# Altium PCB FanoutTest.PcbDoc
Units mil, origin at the board's own origin, x right, y up, seen from the top; angles counter-clockwise.
Board outline 1721.43 x 2434.85 mil, 4 copper layers (Top Layer, GND, POWER, Bottom Layer), stack 61.066 mil thick; 33 components, 24 nets, 129 pads, 750 vias.
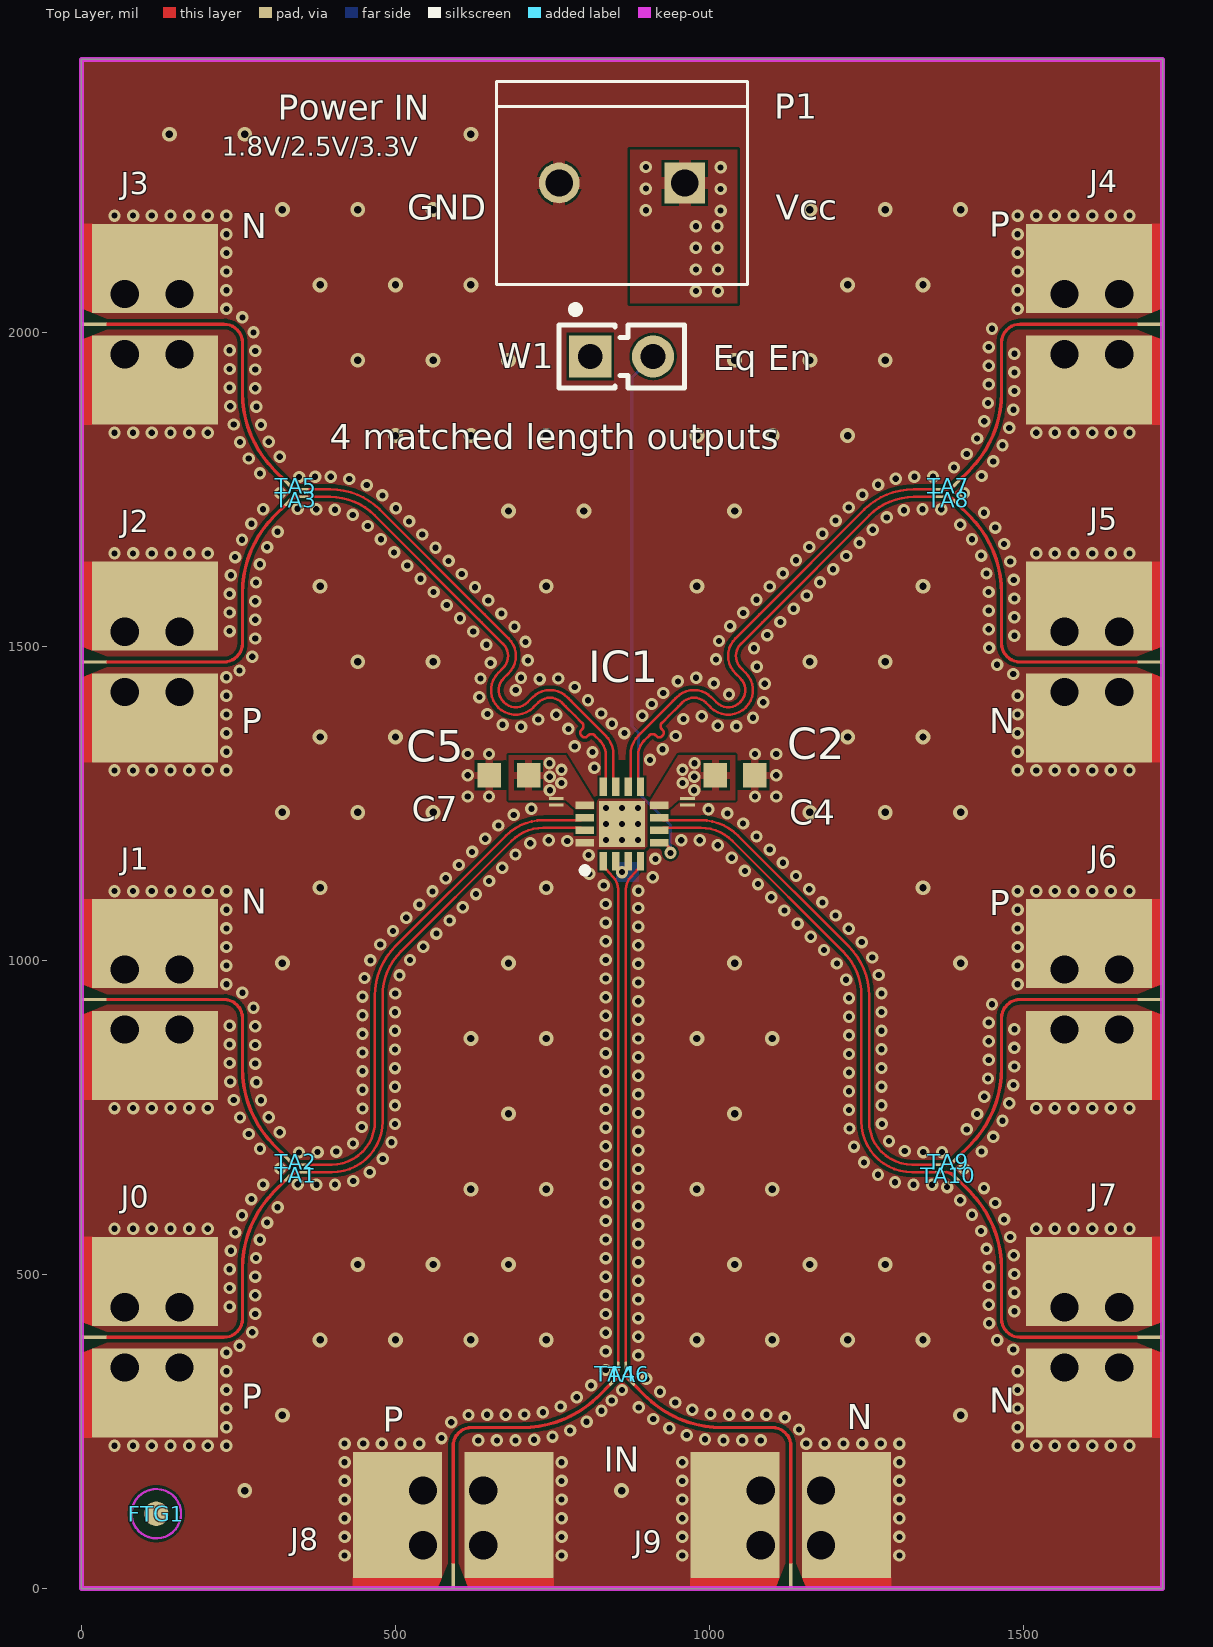
[diagram p0: Top Layer view]
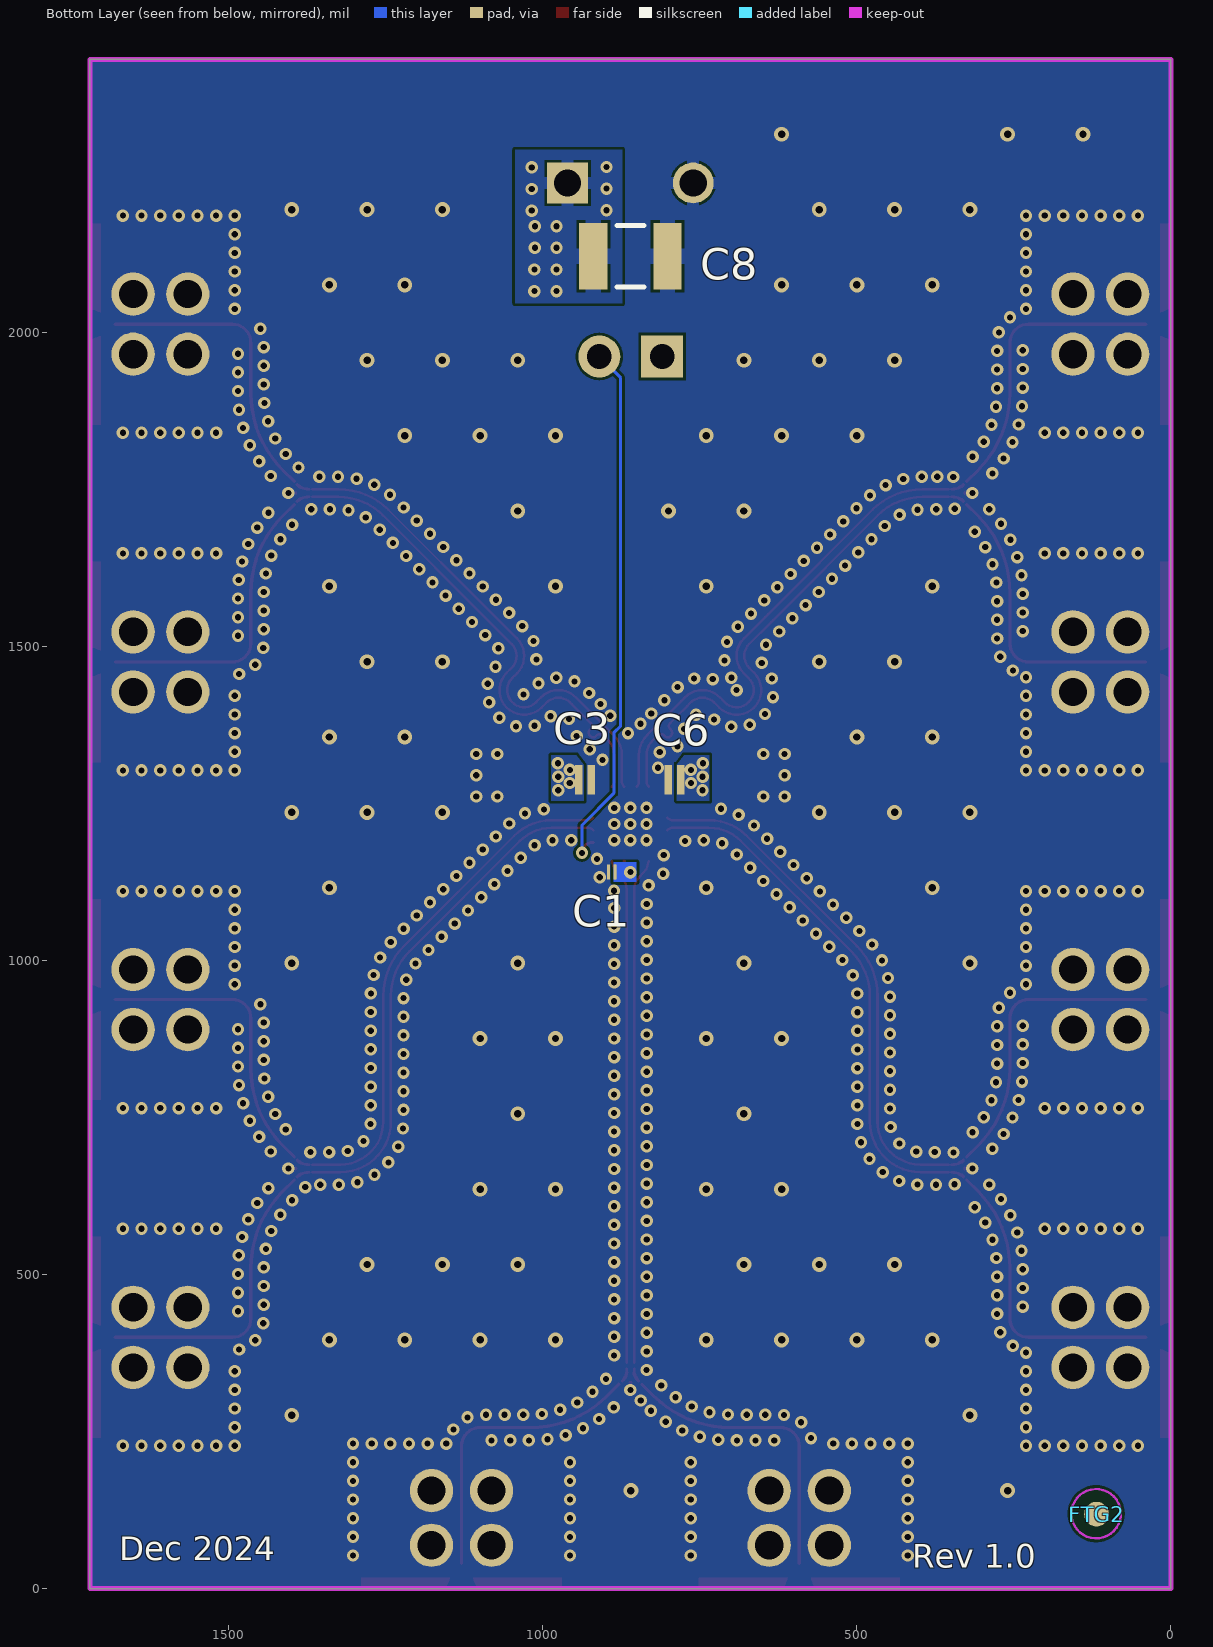
[diagram p1: Bottom Layer view, seen from below]
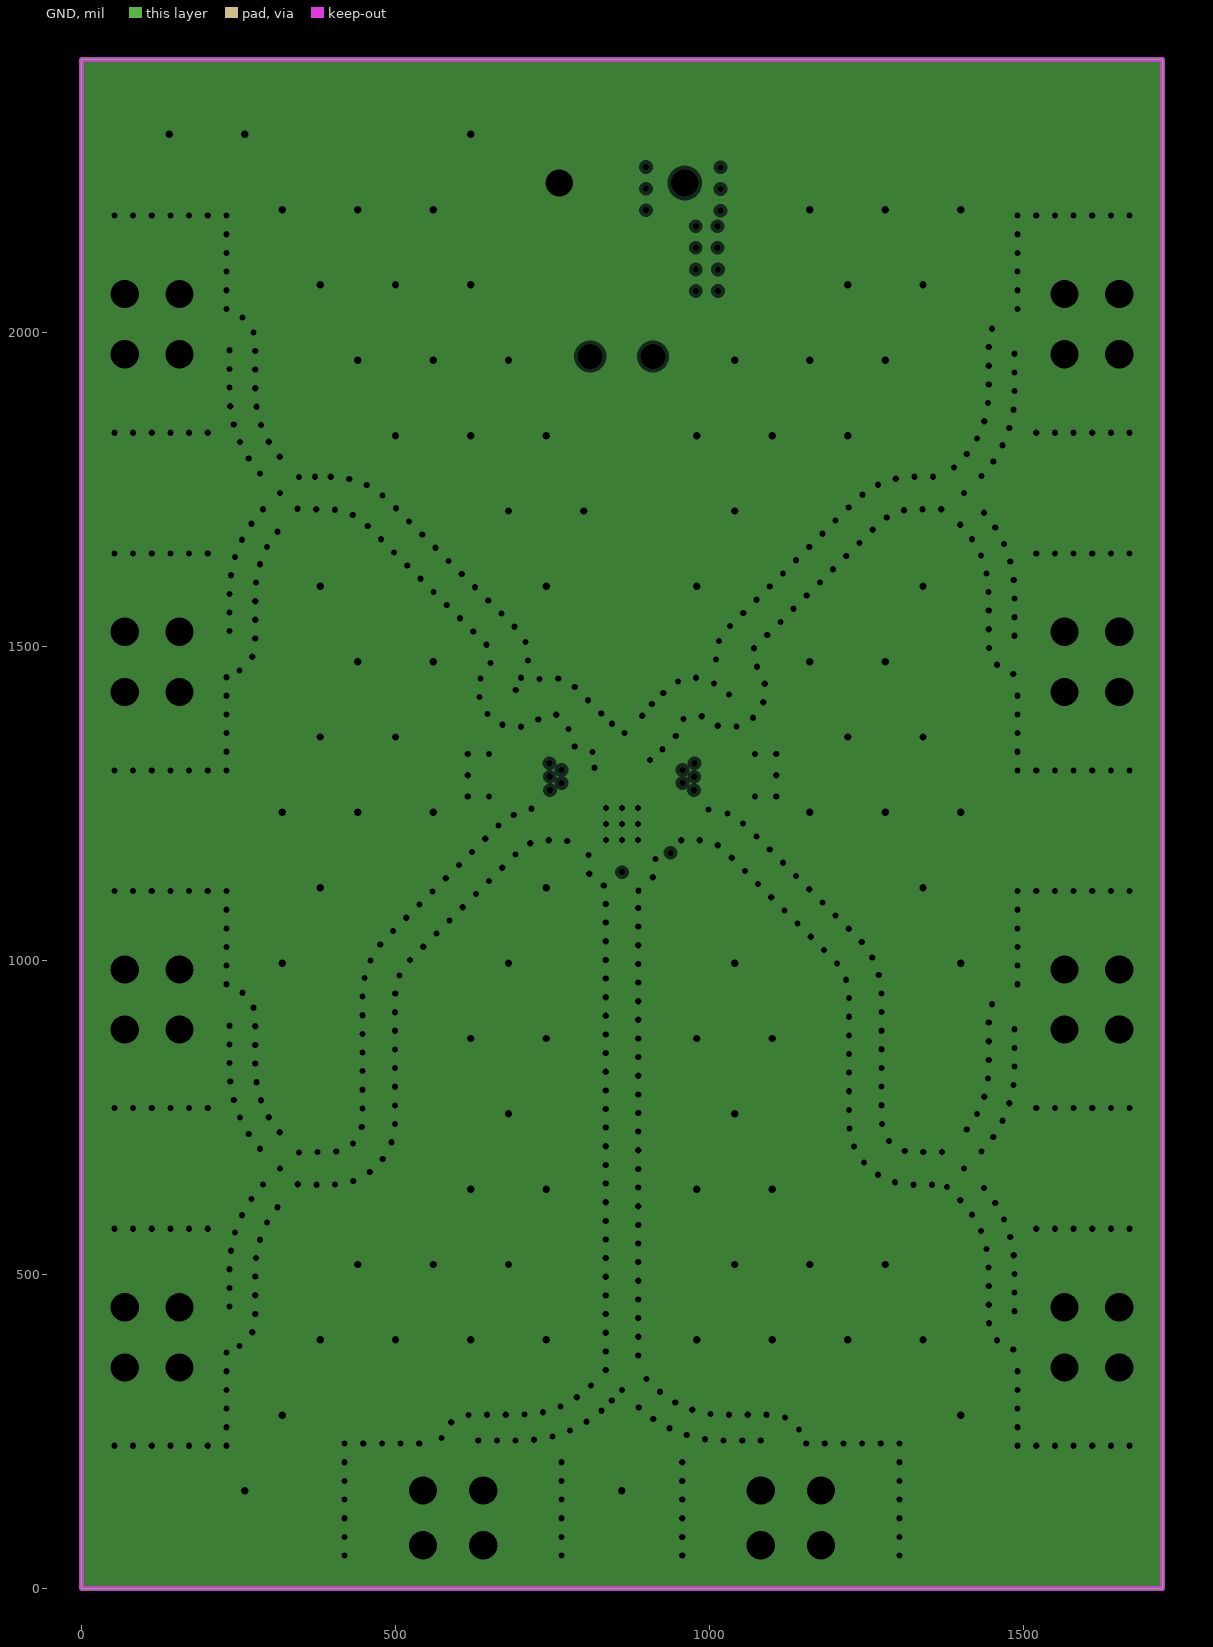
[diagram p2: GND, clearances drawn from the general rule]
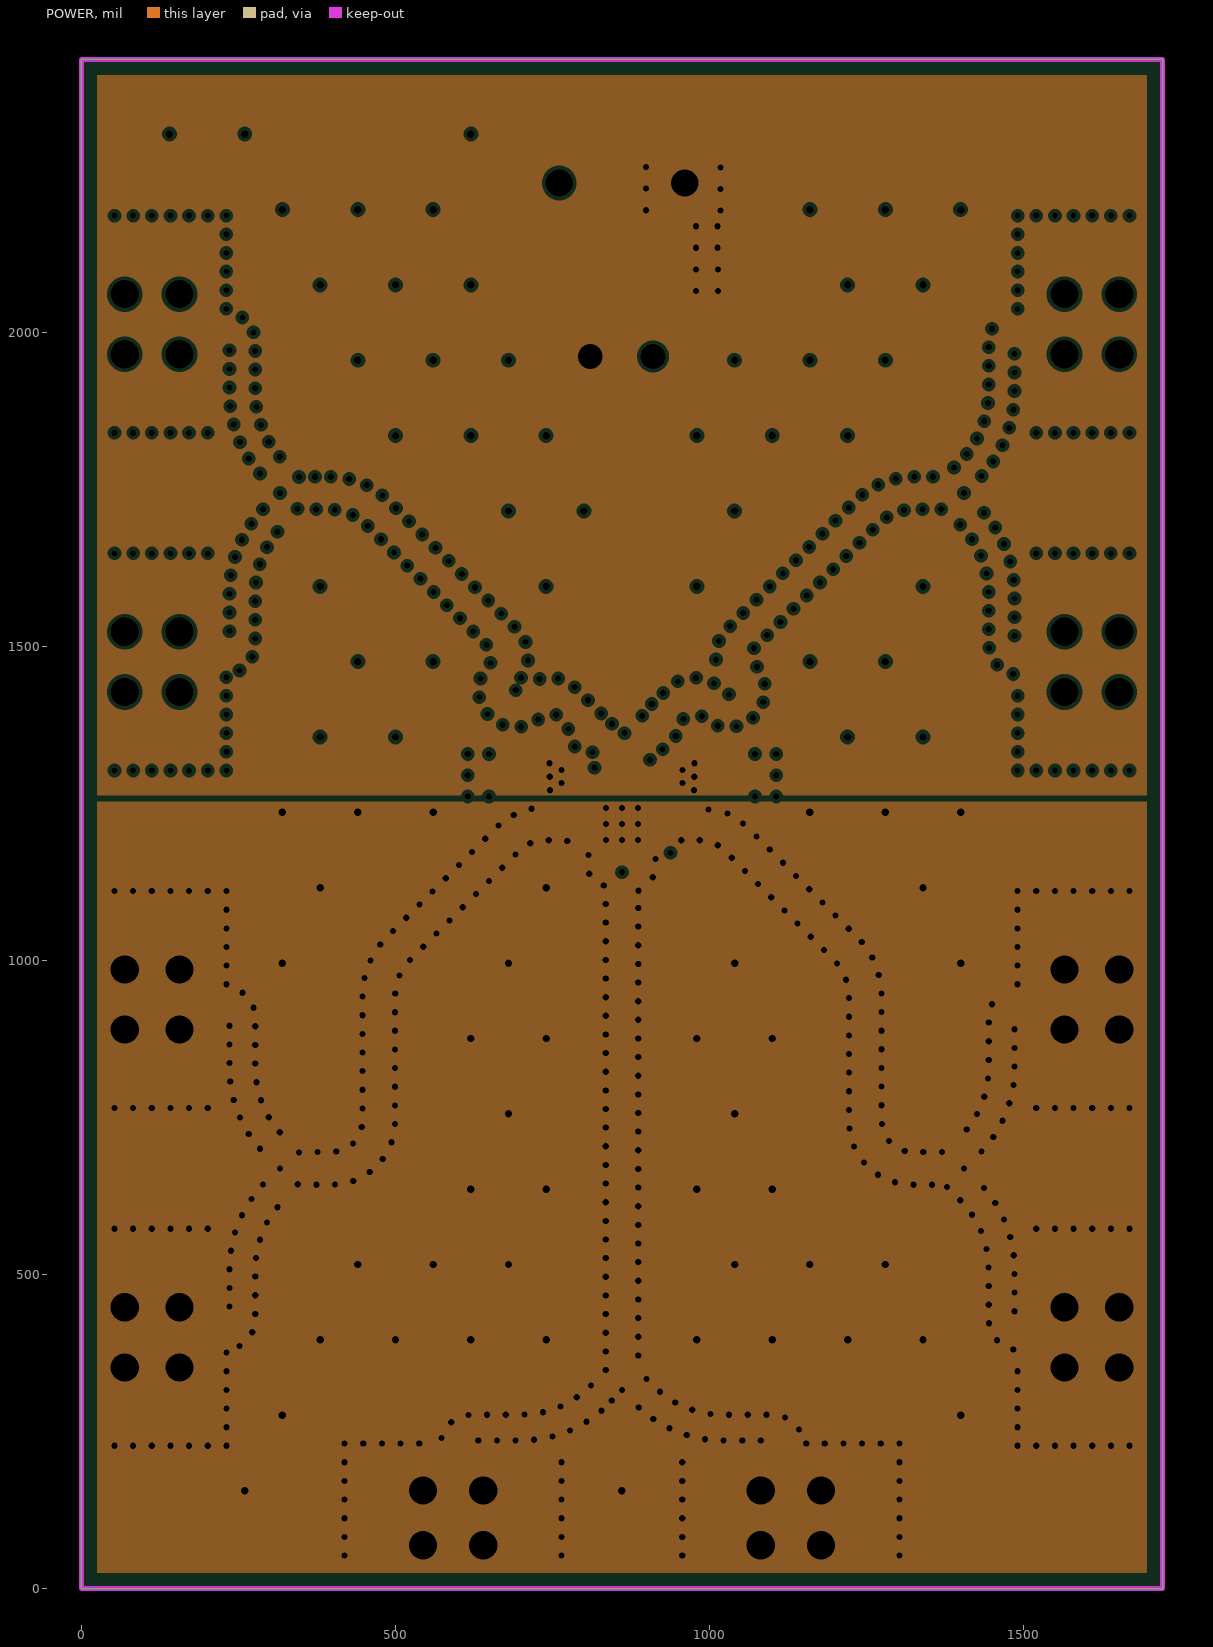
[diagram p3: POWER, clearances drawn from the general rule]
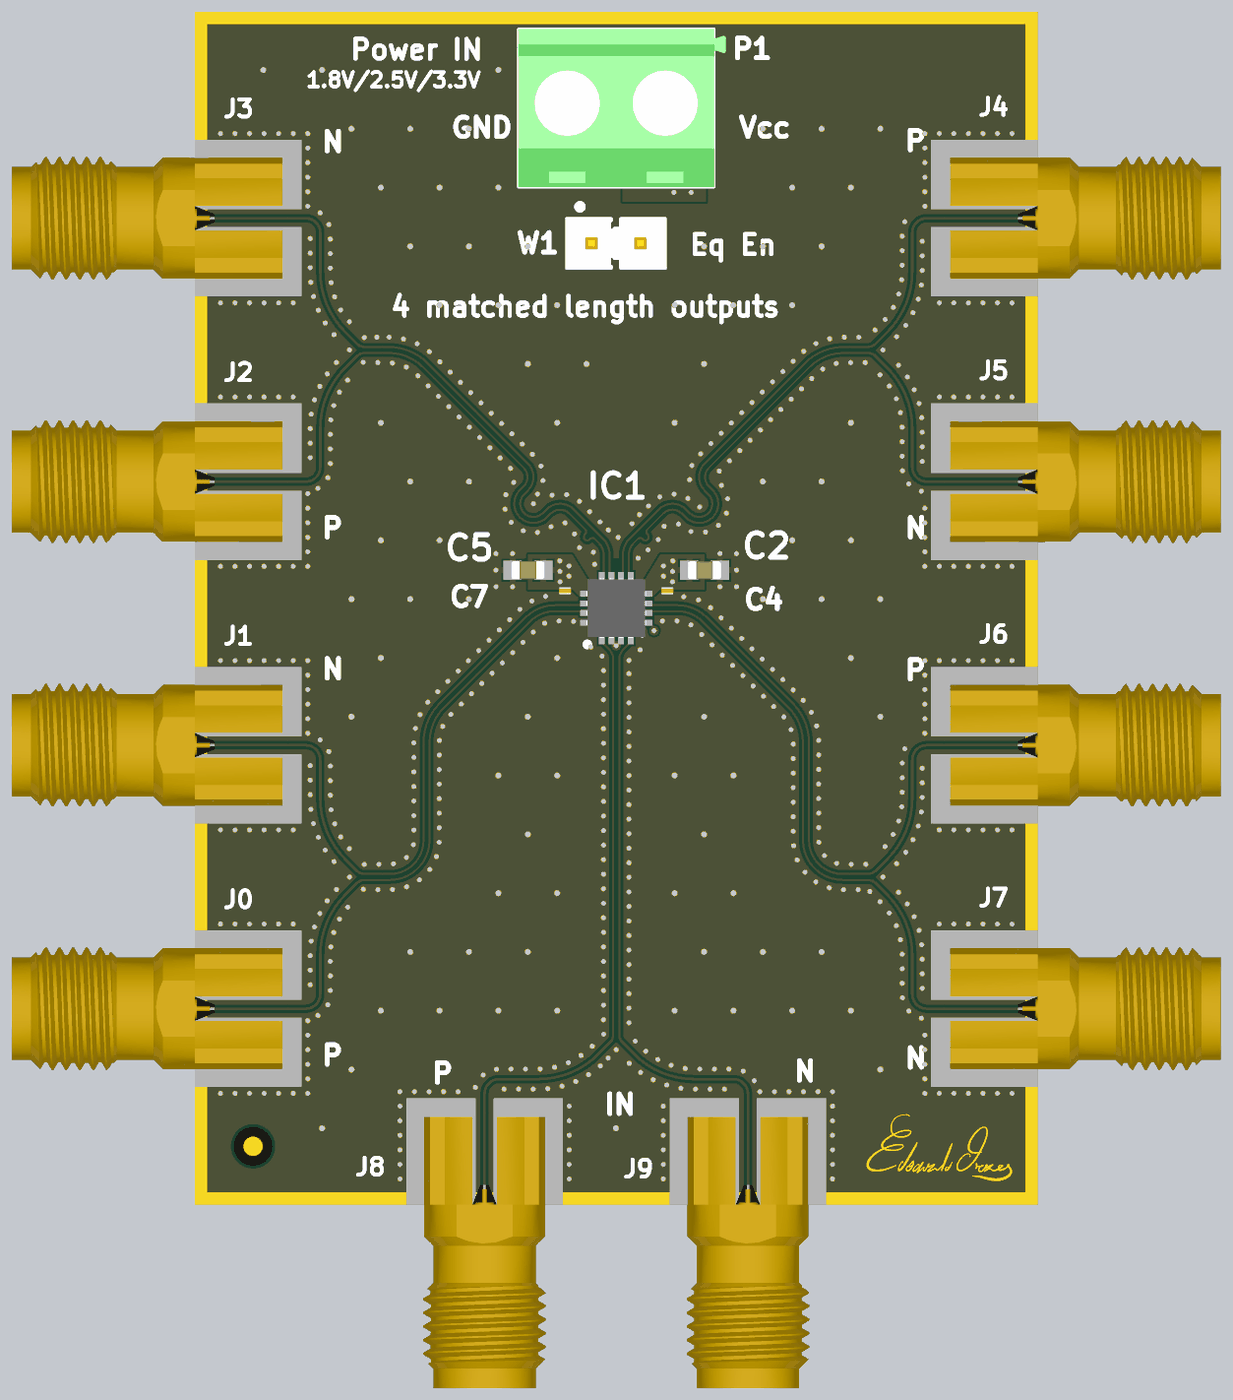
[diagram p4: 3D render of the assembled board from above, using the file's embedded part models]
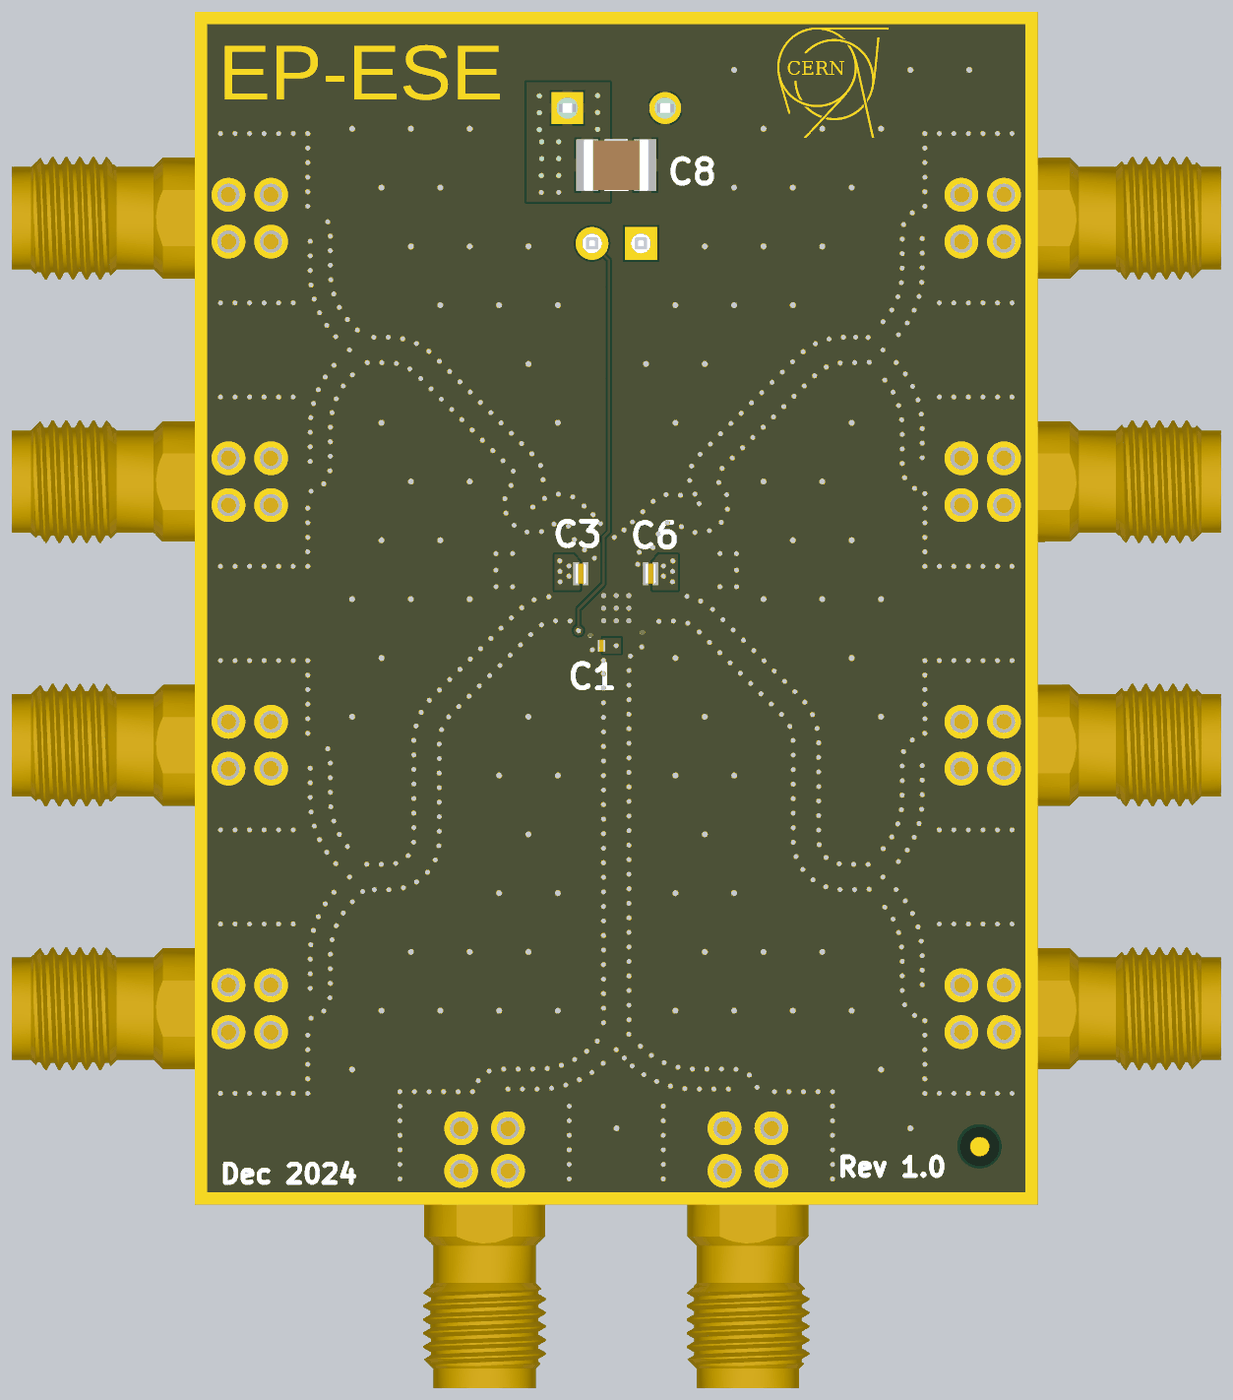
[diagram p5: 3D render of the assembled board from below, using the file's embedded part models]

## Layer stack, top to bottom
Top Solder: solder mask 1.969, Solder Resist, Dk 4.6
Top Layer: signal copper 1.772
Core_Top: core 3.937, R-5775G_1035, Dk 3.46
GND: plane copper 0.689, net GND
PrePreg_Top: prepreg 9.371, R-5670G, Dk 3.4
Core: core 29.528, R-5775G_2116, Dk 3.71
PrePreg_Bot: prepreg 9.371, R-5670G, Dk 3.4
POWER: plane copper 0.689, net Vcc
Core_Bottom: core 3.937, R-5775G_1035, Dk 3.46
Bottom Layer: signal copper 1.772
Bottom Solder: solder mask 1.969, Solder Resist, Dk 4.6

## Board outline
0,0 0,2434.85 1721.43,2434.85 1721.43,0

## Design rules (kind name [scope] priority, off if disabled: settings)
BoardOutlineClearance BoardOutlineClearance_Silk_SMA [HasFootprint('CONSMA022-G') And (OnLayer('Top Overlay') Or OnLayer('Bottom Overlay'))] p1: gap=0 ignorepadtopadclearanceinfootprint=FALSE
BoardOutlineClearance [All] p2: gap=20 ignorepadtopadclearanceinfootprint=FALSE except(0: SMDPad-OutlineEdge Fill-OutlineEdge Poly-OutlineEdge Region-OutlineEdge)
Clearance Clearance_Coplanar [InAnyDifferentialPair or InNetClass('50ohm') or HasFootprint('lane_width_transition')] p1: gap=4 ignorepadtopadclearanceinfootprint=FALSE except(6: Arc-Fill Arc-Poly Arc-Region Track-Fill Track-Poly Track-Region Fill-Fill Fill-Poly Fill-Region Poly-Poly Poly-Region Region-Region)
Clearance Clearance_SMA_pad [HasFootprint('CONSMA022-G') and InNetClass('50ohm')] p2: gap=4 ignorepadtopadclearanceinfootprint=FALSE except(27.6: SMDPad-Fill SMDPad-Poly SMDPad-Region)
Clearance Clearance_SMA_pad_pad [HasFootprint('CONSMA022-G')] p3: gap=4 ignorepadtopadclearanceinfootprint=TRUE
Clearance Clearance_1 [All] p4: gap=4 ignorepadtopadclearanceinfootprint=FALSE
ComponentClearance [All] p1: gap=0 collisioncheckmode=3 verticalgap=0 showdistances=FALSE
DiffPairsRouting [InDifferentialPairClass('All Differential Pairs')] p1: maxlimit=8.23 minlimit=8.23 mostfreqgap=8.23 toplayer_minwidth=4 toplayer_maxwidth=4 toplayer_prefwidth=4 bottomlayer_minwidth=4 bottomlayer_maxwidth=4 bottomlayer_prefwidth=4 impedanceprofiledriven=TRUE impedanceprofileid={AE721103-BE0F-4CC0-B565-BE557CF18860} impedanceprofilevalue=100.000000 maxuncoupledlength=200
HoleSize [All] p1: absolutevalues=TRUE maxlimit=255.91 minlimit=9.84 maxpercent=80.000 minpercent=20.000
HoleToHoleClearance [Isvia] p1: gap=11 allowstackedmicrovias=TRUE
HoleToHoleClearance HoleToHoleClearance_Standard [All] p2: gap=16 allowstackedmicrovias=TRUE
MatchedLengths MatchedLengths_Output_Lanes [InNetClass('Output_Lanes')] p1: tolerance=1.5 checknetsindiffpair=FALSE checkdiffpairvsdiffpair=TRUE checkxsignals=TRUE checkothers=TRUE
MatchedLengths MatchedLengths_Inside [InDifferentialPairClass('All Differential Pairs')] p2: tolerance=1 checknetsindiffpair=TRUE checkdiffpairvsdiffpair=FALSE checkxsignals=FALSE checkothers=FALSE
MinimumAnnularRing [not IsVia] p1: minimumring=6
MinimumSolderMaskSliver [All] p1: minsoldermaskwidth=2
PlaneClearance [All] p1: clearance=6
PlaneConnect PlaneConnect_SMA [HasFootprint('CONSMA022-G')] p1: planeconnectstyle=Direct reliefexpansion=20 reliefentries=4 reliefconductorwidth=10 reliefairgap=10
PlaneConnect PlaneConnect_Frame_Hole [InPadClass('Frame_Holes')] p2: planeconnectstyle=Direct reliefexpansion=20 reliefentries=4 reliefconductorwidth=10 reliefairgap=10
PlaneConnect PlaneConnect_PWR [InComponentClass('PWR_Jumper') or HasFootprint('TE_282837-2')] p3: planeconnectstyle=Relief reliefexpansion=20 reliefentries=4 reliefconductorwidth=25 reliefairgap=7
PlaneConnect [All] p4: pad.planeconnectstyle=Relief pad.reliefexpansion=20 pad.reliefentries=4 pad.reliefconductorwidth=12 pad.reliefairgap=7 via.planeconnectstyle=Direct via.reliefexpansion=20 via.reliefentries=4 via.reliefconductorwidth=10 via.reliefairgap=10
PolygonConnect PolygonConnect_SMA [HasFootprint('CONSMA022-G')] p1: connectstyle=Direct reliefconductorwidth=10 reliefentries=4 polygonreliefangle="90 Angle" airgapwidth=4
PolygonConnect PolygonConnect_Direct [(HasFootprint('CP_32_11_ADI') OR HasFootprint('LLL03TR61E333KE01') OR HasFootprint('SON50P300X300X80-11N-R175X248') OR HasFootprint('CAPC0510X04N') OR HasFootprint('QFN50P300X300X100-17N'))] p2: connectstyle=Direct reliefconductorwidth=10 reliefentries=4 polygonreliefangle="90 Angle" airgapwidth=10 // LDO, CDR, FF, Fanout, some small capacitor
PolygonConnect PolygonConnect_Large [AsMM(PadXSize_AllLayers + PadYSize_AllLayers) > 2.5] p3: thpad.connectstyle=Relief thpad.reliefconductorwidth=20 thpad.reliefentries=4 thpad.polygonreliefangle="90 Angle" thpad.airgapwidth=4 smdpad.connectstyle=Relief smdpad.reliefconductorwidth=25 smdpad.reliefentries=4 smdpad.polygonreliefangle="90 Angle" smdpad.airgapwidth=4 via.connectstyle=Direct via.reliefconductorwidth=10 via.reliefentries=4 via.polygonreliefangle="90 Angle" via.airgapwidth=10
PolygonConnect "PolygonConnect_ Mid" [AsMM(PadXSize_AllLayers + PadYSize_AllLayers) > 1.5] p4: thpad.connectstyle=Relief thpad.reliefconductorwidth=12 thpad.reliefentries=4 thpad.polygonreliefangle="90 Angle" thpad.airgapwidth=4 smdpad.connectstyle=Relief smdpad.reliefconductorwidth=12 smdpad.reliefentries=4 smdpad.polygonreliefangle="90 Angle" smdpad.airgapwidth=4 via.connectstyle=Direct via.reliefconductorwidth=12 via.reliefentries=4 via.polygonreliefangle="90 Angle" via.airgapwidth=5
PolygonConnect [All] p5: thpad.connectstyle=Relief thpad.reliefconductorwidth=10 thpad.reliefentries=4 thpad.polygonreliefangle="90 Angle" thpad.airgapwidth=4 smdpad.connectstyle=Relief smdpad.reliefconductorwidth=8 smdpad.reliefentries=4 smdpad.polygonreliefangle="90 Angle" smdpad.airgapwidth=4 via.connectstyle=Direct via.reliefconductorwidth=10 via.reliefentries=4 via.polygonreliefangle="90 Angle" via.airgapwidth=10
RoutingVias [All] p1: holewidth=9.84 width=19.68 viastyle="Through Hole" minholewidth=9.84 minwidth=19.68 maxholewidth=11.81 maxwidth=23.62
SilkToSilkClearance [All] p1: silktosilkclearance=0
SilkToSolderMaskClearance [All] p1: minsilkscreentomaskgap=3.5 clearancetoexposedcopper=TRUE
SolderMaskExpansion SolderMaskExpansion_Via [IsVia] p1: expansion=4 istentingtop=TRUE
SolderMaskExpansion [All] p2: expansion=0 istentingtop=FALSE
Width Width_lane_width_transition_arcs [HasFootprint('lane_width_transition') and (IsArc or IsTrack)] p1: maxlimit=10 minlimit=1 preferedwidth=10 minimp=50.000000 maximp=50.000000 favimp=50.000000
Width Width_50ohm [InNetClass('50ohm')] p2: maxlimit=5.18 minlimit=5.18 preferedwidth=5.18 impedanceprofiledriven=TRUE impedanceprofileid={DDC6E9F5-BC60-4B40-A729-D674AE4FAE2B} impedanceprofilevalue=50.000000 minimp=50.000000 maximp=50.000000 favimp=50.000000
Width [All] p3: maxlimit=100 minlimit=5 preferedwidth=6 minimp=50.000000 maximp=50.000000 favimp=50.000000
21 further rules are at their usual default settings.

## Classes and differential pairs
net class Output_Lanes: OUT_0_N OUT_0_P OUT_1_N OUT_1_P OUT_2_N OUT_2_P OUT_3_N OUT_3_P
net class 50ohm: NetJ0_1 NetJ1_1 NetJ2_1 NetJ3_1 NetJ4_1 NetJ5_1 NetJ6_1 NetJ7_1 NetJ8_1 NetJ9_1
differential pair OUT_3: +OUT_3_P -OUT_3_N
differential pair OUT_2: +OUT_2_P -OUT_2_N
differential pair OUT_1: +OUT_1_P -OUT_1_N
differential pair OUT_0: +OUT_0_P -OUT_0_N
differential pair IN: +IN_P -IN_N

## Components (designator, comment, footprint, x,y, rotation, side; value= is the part's Value field where it differs from the comment)
C1 "33nF" LLL03TR61E333KE01 890.49,1140.81 r180 bottom
C2 "10uF" CAPC1608X87N 1040.97,1295.02 r180 top
C3 "470nF" CAPC0510X04N 932.96,1288.06 r0 bottom
C4 "33nF" LLL03TR61E333KE01 965.05,1252.95 r90 top
C5 "10uF" CAPC1608X87N 680.46,1295.02 r0 top
C6 "470nF" CAPC0510X04N 790.6,1288.06 r180 bottom
C7 "33nF" LLL03TR61E333KE01 756.13,1252.86 r90 top
C8 "100uF" CAPC3225X270N 860.72,2121.6 r0 bottom
FTG1 "Use only in PCB" FIDUCIAL_TOP_C100-200#1 119.1,119.1 r90 top
FTG2 "Use only in PCB" FIDUCIAL_TOP_C100-200#2 119.1,119.1 r90 bottom
IC1 "NB7VQ14MMNHTBG" QFN50P300X300X100-17N 860.72,1217.42 r90 top locked
J0 "SMA" CONSMA022-G 0,400 r270 top
J1 "SMA" CONSMA022-G 0,937.8 r270 top
J2 "SMA" CONSMA022-G 0,1475.59 r270 top
J3 "SMA" CONSMA022-G 0,2013.39 r270 top
J4 "SMA" CONSMA022-G 1721.43,2013.39 r90 top
J5 "SMA" CONSMA022-G 1721.43,1475.59 r90 top
J6 "SMA" CONSMA022-G 1721.43,937.8 r90 top
J7 "SMA" CONSMA022-G 1721.43,400 r90 top
J8 "SMA" CONSMA022-G 591.82,0 r0 top
J9 "SMA" CONSMA022-G 1129.62,0 r0 top
P1 "282837-2" TE_282837-2 860.72,2238.22 r180 top
TA1 "Differential to Single Transition" lane_width_transition#1 343.7,668.9 r270 top net-tie
TA2 "Differential to Single Transition" lane_width_transition#2 343.7,668.9 r90 top net-tie
TA3 "Differential to Single Transition" lane_width_transition#1 343.7,1744.49 r270 top net-tie
TA4 "Differential to Single Transition" lane_width_transition#2 860.72,343.7 r180 top net-tie
TA5 "Differential to Single Transition" lane_width_transition#2 343.7,1744.49 r90 top net-tie
TA6 "Differential to Single Transition" lane_width_transition#1 860.72,343.7 r0 top net-tie
TA7 "Differential to Single Transition" lane_width_transition#1 1377.73,1744.49 r90 top net-tie
TA8 "Differential to Single Transition" lane_width_transition#2 1377.73,1744.49 r270 top net-tie
TA9 "Differential to Single Transition" lane_width_transition#1 1377.73,668.9 r90 top net-tie
TA10 "Differential to Single Transition" lane_width_transition#2 1377.73,668.9 r270 top net-tie
W1 "Header 2" SAMTEC_HTSW-102-23-L-S 810.17,1961.88 r0 top

## Footprints (in the part's own frame and the unit in brackets; to place one, negate y for a bottom-side part, rotate by r counter-clockwise, add the part's x,y. Pads: shape width x height; smd on the part's side, far side on the other; paste and mask are expansions set on the pad)
CAPC0510X04N [mm] "Chip Capacitor, 2-Leads, Body 0.52x1.00mm, IPC Medium Density"
  rect 0.3x1.2 smd: 1(-0.25,0) 2(0.25,0)
  body extent -0.29,-0.53 0.29,0.53, height 0.35
CAPC1608X87N [mm] "Chip Capacitor, Body 1.6x0.8mm IPC Medium Density"
  rect 0.95x1 smd: 1(-0.8,0) 2(0.8,0)
  body extent -0.87,-0.47 0.88,0.48, height 0.87
CAPC3225X270N [mm] "Chip Capacitor, Body 3.2x2.5mm, IPC Medium Density"
  rect 1.15x2.7 smd: 1(-1.5,0) 2(1.5,0)
  silkscreen extent -0.55,-1.25 0.55,1.25, body extent -1.7,-1.35 1.7,1.35, height 2.7
CONSMA022-G [mm] "Footprint taken from TE website (SamacSys lib) and pin shrinked to 5.181mil (my 50ohm trace width)"
  rect 3.6x5.099 smd mask+0: 0(2.26,2.98) 0_1(-2.26,2.98)
  round 1.448 / inner round 1.448 / far side round 1.753 hole 1.14: 0_2(1.215,1.75) 0_3(1.215,3.96) 0_4(-1.215,3.96) 0_5(-1.215,1.75)
  rect 0.132x1.016 smd mask+0: 1(0,0.508)
  Top Layer pour cut-out: -0.635,0 0.635,0 0.218,1.026 -0.218,1.026
  Top Layer pour cut-out: 0.831,0 0.46,0 0.894,0
  Top Layer region: -0.46,0.431 -0.635,0 -4.06,0 -4.06,0.431
  Top Layer region: 0.46,0.431 0.635,0 4.06,0 4.06,0.431
  body extent -3.18,-9.5 3.18,4.55, height 3.32
FIDUCIAL_TOP_C100-200#1 [mm] "Round Fiducial Target, Top Layer, 1.0mm, Top Solder 2.0mm, Keepout =2.0mm"
  round 1 smd paste-0.51 mask+0.5: FTG2(0,0)
  Top Layer keep-out circle w0.1: c0,0 r1
FIDUCIAL_TOP_C100-200#2 [mm] "Round Fiducial Target, Top Layer, 1.0mm, Top Solder 2.0mm, Keepout =2.0mm"
  round 1 smd paste-0.51 mask+0.5: FTG2(-0.016,-0.016)
  Top Layer keep-out circle w0.1: c0,0 r1
lane_width_transition#1 [mil]
  oval 4x15 smd paste-99999 mask+0: D(6.11,10.45)
  oval 14x5.18 smd rot 135 paste-99999 mask+0: S(15.27,-15.27)
  Top Layer region: 4.61,0.72 5.71,-5.81 8.97,-11.74 13.29,-10.34 10.63,-6.95 9.08,-3.38 7.86,0.45
  Top Layer lines w1: 10.74,-13.69 cw(c24.61,0.72) 4.61,0.72 ; 13.29,-10.34 cw(c27.61,3.63) 7.61,3.63
  Top Layer lines w4: 6.11,0.45 6.11,5.89
  Top Layer lines w5.18: 13.37,-13.37 11.74,-11.74
lane_width_transition#2 [mil]
  oval 4x15 smd paste-99999 mask+0: D(6.11,-10.45)
  oval 14x5.18 smd rot 45 paste-99999 mask+0: S(15.27,15.27)
  Top Layer region: 4.61,-0.72 5.71,5.81 8.97,11.74 13.29,10.34 10.63,6.95 9.08,3.38 7.86,-0.45
  Top Layer lines w1: 10.74,13.69 ccw(c24.61,-0.72) 4.61,-0.72 ; 13.29,10.34 ccw(c27.61,-3.63) 7.61,-3.63
  Top Layer lines w4: 6.11,-0.45 6.11,-5.89
  Top Layer lines w5.18: 13.37,13.37 11.74,11.74
LLL03TR61E333KE01 [mm] "Chip Capacitor, 2-Leads, Body 0.30x0.60mm, IPC High Density"
  rect 0.125x0.6 smd: 1(-0.126,0) 2(0.126,0)
  body extent -0.17,-0.32 0.17,0.32, height 0.2
QFN50P300X300X100-17N [mm]
  rect 0.75x0.3 smd: 1(-1.5,0.75) 2(-1.5,0.25) 3(-1.5,-0.25) 4(-1.5,-0.75) 9(1.5,-0.75) 10(1.5,-0.25) 11(1.5,0.25) 12(1.5,0.75)
  rect 0.3x0.75 smd: 5(-0.75,-1.5) 6(-0.25,-1.5) 7(0.25,-1.5) 8(0.75,-1.5) 13(0.75,1.5) 14(0.25,1.5) 15(-0.25,1.5) 16(-0.75,1.5)
  rect 1.85x1.85 smd: 17(0,0)
  silkscreen extent -2,1.37 -1.75,1.62, body extent -1.55,-1.55 1.55,1.55, height 1
SAMTEC_HTSW-102-23-L-S [mm] "2 Contacts - Pitch 2.54mm - Single Row  Through Mount Straigh Header (Post Lead 5.84mm, Tail Lead 2.92mm, Insulator 2.54mm)"
  rect 1.7x1.7 hole 1: 1(0,0)
  round 1.7 hole 1: 2(2.54,0)
  silkscreen extent -1.27,-1.27 3.81,2.05, body extent -1.27,-1.27 3.81,1.27, height 8.38
TE_282837-2 [mm]
  rect 1.65x1.65 hole 1.1: 1(-2.54,0)
  round 1.65 hole 1.1: 2(2.54,0)
  silkscreen extent -5.08,-4.1 5.08,4.1, body extent -5.68,-4.1 5.08,4.1, height 10

## Part data
C1 C4 C7: library part "Capacitor - non polarized", "LLL03TR61E333KE01"
C2 C5: library part CC0603_10UF_6.3V_20%_X5R, "GRM188D71A106KA73", Case=0603, Manufacturer=GENERIC, Manufacturer1 ComponentHeight=0.95mm, Manufacturer1 Example=KEMET, Manufacturer1 Part Number=C0603C106M9PAC, Manufacturer Part Number=CC0603_10uF_6.3V_20%_X5R, Tolerance=±20%, Voltage=6.3V, Author="CERN DEM JLC", Component Type=Standard, CreateDate=03/12/2007, HelpURL=\\cern.ch\dfs\Applications\Altium\Datasheets\CC0603_X5R_KEMET.pdf, LatestRevisionDate=03/12/2007, Mounted=Yes, Part Description="SMD Multilayer Chip Ceramic Capacitor", Part Number=CC0603_10UF_6.3V_20%_X5R, Pin Count=2, Sense=No, SMD=Yes, Socket=No, Status=Preferred, TC=X5R
C3 C6: library part "Capacitor - non polarized", "LLL153C70G474ME17"
C8: library part CC1210_100UF_6.3V_20%_X7U, "GRM32EC70J107ME15", Case=1210, Manufacturer=GENERIC, Manufacturer1 ComponentHeight=2.7mm, Manufacturer1 Example=MURATA, Manufacturer1 Part Number=GRM32EE70J107ME15L, Tolerance=±20%, Voltage=6.3V, Author="CERN DEM MR", Component Type=Standard, CreateDate=10/12/2017, HelpURL=\\cern.ch\dfs\Applications\Altium\Datasheets\CC1210_X7U_MURATA.pdf, LatestRevisionDate=10/12/2017, Manufacturer Part Number=CC1210_100UF_6.3V_20%_X7U, Mounted=Yes, Part Description="SMD Multilayer Chip Ceramic Capacitor", Part Number=CC1210_100UF_6.3V_20%_X7U, Pin Count=2, Sense=No, SMD=Yes, Socket=No, Status=None, TC=X7U
FTG1 FTG2: library part FIDUCIAL_TARGET_C100-200, "Fiducial Target", Author="CERN DEM JLC", Component Type="Standard (No BOM)", ComponentHeight=0mm, CreateDate=09/02/2010, Family=Fiducial, HelpURL=Undefined, LatestRevisionDate=04/04/2012, Mounted=No, PackageDescription="Round Fiducial Target, Top Layer, 1.0mm, Top Solder 2.0mm, Keepout =2.0mm", Part Description="Round Fiducial Target, Top Layer, 1.0mm, Top Solder 2.0mm, Keepout =2.0mm", Part Number=FIDUCIAL_TARGET_C100-200, Pin Count=1, Sense=No, SMD=Yes, Socket=No, Status=None
IC1: "Integrated Circuit", Manufacturer_Name=onsemi, Mouser Part Number=863-NB7VQ14MMNHTBG, Arrow Part Number=NB7VQ14MMNHTBG, Arrow Price/Stock=https://www.arrow.com/en/products/nb7vq14mmnhtbg/on-semiconductor?utm_currency=USD&region=nac, Datasheet Link=http://www.onsemi.com/pub/Collateral/NB7VQ14M-D.PDF, Height=1mm, Manufacturer_Part_Number=NB7VQ14MMNHTBG, Mouser Price/Stock=https://www.mouser.co.uk/ProductDetail/onsemi/NB7VQ14MMNHTBG?qs=3PKVEWFFm2%2FWq%2FFZ4xstfg%3D%3D
P1: Package=None, Availability="In Stock", Check_prices=https://www.snapeda.com/parts/282837-2/TE+Connectivity+AMP+Connectors/view-part/?ref=eda, MF="TE Connectivity", MP=282837-2, Price=None, Purchase-URL=https://pricing.snapeda.com/search/part/282837-2/?ref=eda, SnapEDA_Link=https://www.snapeda.com/parts/282837-2/TE+Connectivity+AMP+Connectors/view-part/?ref=snap
TA1 TA2 TA3 TA4 TA5 TA6 TA7 TA8 TA9 TA10: library part lane_width_transition
W1: library part SAMTEC_HTSW-102-23-L-S, "2 Mini Wire-Wrap Contact Strip Header", Manufacturer=SAMTEC, Manufacturer Part Number=HTSW-102-23-L-S, Author="CERN DEM JLC", Component Type=Standard, ComponentHeight=8.38mm, CreateDate=2/22/2018, Family="Header 2", HelpURL=\\cern.ch\dfs\Applications\Altium\Datasheets\SAMTEC_HTSW-102-23-L-S.pdf, LatestRevisionDate=2/22/2018, Mounted=Yes, Part Description="2 Contacts, Pitch 2.54mm, Single Row  Through Mount Straight Header (Post Lead 5.84mm, Tail Lead 2.92mm, Insulator 2.54mm)", Part Number=SAMTEC_HTSW-102-23-L-S, Pin Count=2, PressFit=No, Sense=No, SMD=No, Socket=No, Status=Preferred, Status Comment="High Temperature"

## Via types
v1: diameter 19.68, hole 9.84, Top Layer to Bottom Layer, tented both sides, 668 vias
v2: diameter 23.62, hole 11.81, Top Layer to Bottom Layer, tented both sides, 82 vias

## Nets (pads, with @x,y where several pads share a name; then routed paths per layer and width w, separated by ;. In a path a pad name is that pad's centre, name@x,y a point inside that pad or via, vN(x,y) a via of type N, cw(c..) or ccw(c..) an arc to the next point about the centre after c; other vN are vias at no path point)
GND: C1.1 C2.1 C3.1 C4.1 C5.1 C6.1 C7.1 C8.1 IC1.16 IC1.17 J0.0 J0.0_1 J0.0_2 J0.0_3 J0.0_4 J0.0_5 J1.0 J1.0_1 J1.0_2 J1.0_3 J1.0_4 J1.0_5 J2.0 J2.0_1 J2.0_2 J2.0_3 J2.0_4 J2.0_5 J3.0 J3.0_1 J3.0_2 J3.0_3 J3.0_4 J3.0_5 J4.0 J4.0_1 J4.0_2 J4.0_3 J4.0_4 J4.0_5 J5.0 J5.0_1 J5.0_2 J5.0_3 J5.0_4 J5.0_5 J6.0 J6.0_1 J6.0_2 J6.0_3 J6.0_4 J6.0_5 J7.0 J7.0_1 J7.0_2 J7.0_3 J7.0_4 J7.0_5 J8.0 J8.0_1 J8.0_2 J8.0_3 J8.0_4 J8.0_5 J9.0 J9.0_1 J9.0_2 J9.0_3 J9.0_4 J9.0_5 P1.2 | length 25.6
  Top Layer w5: v1@322.89,668.9 328.02,668.9 ; v1@322.89,1744.49 328.02,1744.49 ; v1@860.72,322.89 860.72,328.02 ; 1393.42,668.9 v1@1398.55,668.9 ; 1393.42,1744.49 v1@1398.55,1744.49
  other v1: 419.01,52.57 764.63,52.57 956.81,52.57 1302.43,52.57 419.01,82.26 764.63,82.26 956.81,82.26 1302.43,82.26 419.01,111.94 764.63,111.94 956.81,111.94 1302.43,111.94 419.01,141.63 764.63,141.63 956.81,141.63 1302.43,141.63 419.01,171.31 764.63,171.31 956.81,171.31 1302.43,171.31 419.01,201 764.63,201 956.81,201 1302.43,201 52.57,227.19 82.26,227.19 111.94,227.19 141.63,227.19 171.31,227.19 201,227.19 230.68,227.19 1490.75,227.19 1520.44,227.19 1550.12,227.19 1579.81,227.19 1609.49,227.19 1639.18,227.19 1668.86,227.19 419.01,230.68 448.69,230.68 478.38,230.68 508.06,230.68 537.75,230.68 1154,230.68 1183.69,230.68 1213.37,230.68 1243.06,230.68 1272.74,230.68 1302.43,230.68 631.75,235.84 661.43,235.84 691.12,235.84 1022.44,235.84 1052.13,235.84 1081.81,235.84 720.78,236.9 992.81,237.65 573.18,239.51 750.04,241.91 963.86,244.23 778.12,251.56 1142.54,253.1 936.23,255.06 230.68,256.87 1490.75,256.87 588.88,264.7 804.33,265.49 910.52,269.9 1120.04,272.46 616.18,276.35 645.86,276.81 675.55,276.81 705.23,277.01 1031.31,276.81 1060.99,276.81 1090.68,276.81 1001.64,277.97 734.69,280.71 828.16,283.19 972.7,284.57 230.68,286.56 1490.75,286.56 887.32,288.41 762.93,289.83 945.42,296.28 844.31,299.34 788.77,304.46 921.14,313.35 230.68,316.24 860.72,316.11 1490.75,316.24 811.54,323.5 899.61,333.79 230.68,345.93 1490.75,345.93 834.89,347.97 886.68,371.28 230.68,375.61 834.76,377.66 1483.85,380.71 251.59,386.31 1458.09,395.46 886.68,400.97 834.76,407.34 271.83,408.03 1445.36,422.28 886.68,430.65 276.81,437.3 834.76,437.03 1485.6,441.53 235.84,448.95 1444.62,451.95 886.68,460.34 276.81,466.98 834.76,466.71 1485.6,471.21 235.84,478.63 1444.62,481.64 886.68,490.02 834.76,496.4 276.81,496.67 1485.6,500.9 235.84,508.32 1444.56,511.32 886.68,519.71 277.86,526.33 834.76,526.08 1484.43,530.56 237.87,537.93 1441.14,540.81 886.68,549.39 284.05,555.37 834.76,555.77 1479.02,559.74 244.6,566.85 1432.53,569.22 52.57,572.81 82.26,572.81 111.94,572.81 141.63,572.81 171.31,572.81 201,572.81 1520.44,572.81 1550.12,572.81 1579.81,572.81 1609.49,572.81 1639.18,572.81 1668.86,572.81 886.68,579.08 295.56,582.73 834.76,585.45 1469.16,587.75 255.57,594.43 1418.15,595.19 312.28,607.26 886.68,608.76 1455.04,613.86 834.76,615.14 1399.43,618.23 270.54,620.06 1437.17,637.56 886.68,638.45 1378.44,639.22 289.18,643.17 374.06,642.94 403.75,643.13 1324.9,642.94 1354.58,642.94 344.39,643.79 834.76,644.82 1295.48,646.89 432.85,648.98 1268.29,658.81 458.95,663.12 886.68,668.13 316.11,668.9 1405.33,668.9 834.76,674.51 1246.17,678.6 479.86,684.19 346.31,694.39 375.99,694.86 1340.56,694.86 1370.25,694.86 405.66,695.66 1433.45,695.98 1310.93,696.63 886.68,697.82 284.33,700.15 834.76,704.19 1230.26,703.67 432.34,708.67 493.6,710.5 1285.8,712.42 1451.9,719.24 266.45,723.85 315.75,726.58 886.68,727.5 1409.62,731.07 1222.92,732.43 834.76,733.88 446.41,734.81 499.23,739.65 1274.53,739.89 1466.67,744.99 252.32,749.95 298.06,750.42 1426.19,755.7 886.68,757.19 1222.13,762.1 834.76,763.56 52.57,764.99 82.26,764.99 111.94,764.99 141.63,764.99 171.31,764.99 201,764.99 447.38,764.48 1520.44,764.99 1550.12,764.99 1579.81,764.99 1609.49,764.99 1639.18,764.99 1668.86,764.99 499.3,769.34 1274.05,769.57 1477.42,772.66 242.46,777.95 285.74,777.43 1437.62,783.1 886.68,786.87 1222.13,791.79 834.76,793.25 447.38,794.17 499.3,799.02 1274.05,799.25 1483.91,801.62 278.46,806.21 237.01,807.13 1443.62,812.17 886.68,816.56 1222.13,821.47 834.76,822.93 447.38,823.85 499.3,828.71 1274.05,828.94 1485.6,831.26 276.81,835.85 235.84,836.79 1444.62,841.84 886.68,846.24 1222.13,851.16 834.76,852.62 447.38,853.54 499.3,858.39 1274.05,858.62 1485.6,860.94 276.81,865.53 235.84,866.48 1444.62,871.52 886.68,875.93 1222.13,880.84 834.76,882.3 447.38,883.22 499.3,888.08 1274.05,888.31 1485.6,890.63 276.81,895.22 235.84,896.16 1444.62,901.21 886.68,905.61 1222.13,910.53 834.76,911.99 447.38,912.91 499.3,917.76 1274.05,917.99 273.9,924.76 1449.88,930.43 886.68,935.3 1222.13,940.21 834.76,941.67 447.38,942.59 499.61,947.44 1274,947.68 256.16,948.56 230.68,962.18 1490.75,962.18 886.68,964.98 1217.56,969.54 834.76,971.36 450.58,972.1 506.38,976.35 1269.67,977.05 230.68,991.87 1490.75,991.87 886.68,994.67 1202.89,995.35 460.05,1000.24 523.18,1000.82 834.76,1001.04 1259.24,1004.84 1182.32,1016.76 230.68,1021.55 544.17,1021.81 1490.75,1021.55 886.68,1024.35 475.74,1025.44 1242.4,1029.29 834.76,1030.73 1161.33,1037.75 565.16,1042.8 496.03,1047.1 230.68,1051.24 1221.82,1050.68 1490.75,1051.24 886.68,1054.04 1140.34,1058.74 834.76,1060.41 586.15,1063.79 517.02,1068.09 1200.83,1071.67 1119.35,1079.73 230.68,1080.92 1490.75,1080.92 886.68,1083.72 607.14,1084.78 538.01,1089.08 834.76,1090.1 1179.84,1092.66 1098.36,1100.72 628.13,1105.77 559,1110.08 52.57,1110.61 82.26,1110.61 111.94,1110.61 141.63,1110.61 171.31,1110.61 201,1110.61 230.68,1110.61 886.84,1111.11 1490.75,1110.61 1520.44,1110.61 1550.12,1110.61 1579.81,1110.61 1609.49,1110.61 1639.18,1110.61 1668.86,1110.61 1158.85,1113.65 831.77,1119.63 1077.37,1121.71 649.12,1126.76 579.99,1131.07 909.58,1132.49 1137.86,1134.64 808.66,1138.27 1056.38,1142.7 670.11,1147.76 600.98,1152.06 1116.87,1155.63 913.83,1161.86 1035.39,1163.69 807.6,1167.93 691.1,1168.75 621.98,1173.05 1095.88,1176.62 1013.24,1183.45 714.6,1186.88 773.6,1190.37 743.93,1191.46 834.99,1191.7 860.72,1191.7 886.44,1191.7 954.97,1191.46 984.66,1191.46 642.97,1194.04 1074.89,1197.61 663.94,1215.05 834.99,1217.42 860.72,1217.42 886.44,1217.42 1053.57,1218.27 688.35,1231.93 1028.6,1234.33 998.42,1240.67 716.38,1241.72 834.99,1243.15 860.72,1243.15 886.44,1243.15 615.19,1261.24 648.97,1261.24 1072.47,1261.24 1106.25,1261.24 615.19,1295.02 1106.25,1295.02 52.57,1302.78 82.26,1302.78 111.94,1302.78 141.63,1302.78 171.31,1302.78 201,1302.78 230.68,1302.78 1490.75,1302.78 1520.44,1302.78 1550.12,1302.78 1579.81,1302.78 1609.49,1302.78 1639.18,1302.78 1668.86,1302.78 816.79,1306.86 905.24,1319.56 615.19,1328.8 648.97,1328.8 1072.47,1328.8 1106.25,1328.8 813.85,1331.84 230.68,1332.47 1490.75,1332.47 925.41,1336.45 785.6,1340.98 946.36,1357.48 230.68,1362.15 864.54,1362.12 1490.75,1362.15 775.29,1368.82 700.12,1372.3 1042.94,1372.88 1013.27,1373.91 670.61,1375.49 844.67,1376.95 727.45,1383.9 958.4,1384.61 1069.29,1386.55 987.75,1389.07 892.89,1389.93 230.68,1391.84 756.14,1391.5 1490.75,1391.84 646.38,1392.64 827.59,1393.48 908.2,1408.42 1085.69,1411.3 806.6,1414.47 633.57,1419.42 230.68,1421.52 1490.75,1421.52 1031,1423.85 926.46,1426.1 691.52,1430.59 785.56,1435.41 1087.98,1440.89 1007.06,1441.41 949.68,1444.59 729.57,1448.18 635.4,1449.05 759.24,1449.13 699.96,1450.34 230.68,1451.21 978.79,1450.44 1483.85,1456.3 251.59,1461.9 1075.57,1467.86 1458.09,1471.05 651.43,1474.04 710.87,1477.95 1010.36,1479.51 271.83,1483.62 1070.98,1497.19 1445.36,1497.87 644.69,1502.95 706.95,1507.37 1015.09,1508.82 276.81,1512.89 1485.6,1517.12 1091.97,1518.18 623.7,1523.94 235.84,1524.54 1444.62,1527.54 689.61,1531.46 1032.92,1532.55 1112.96,1539.17 276.81,1542.57 602.71,1544.93 1485.6,1546.8 668.62,1552.45 235.84,1554.22 1053.91,1553.54 1444.62,1557.23 1133.95,1560.16 581.72,1565.92 276.81,1572.26 647.62,1573.45 1074.9,1574.53 1485.6,1576.49 1154.94,1581.15 235.84,1583.91 560.73,1586.91 1444.56,1586.91 626.63,1594.44 1095.89,1595.52 277.86,1601.92 1175.93,1602.14 1484.43,1606.15 539.74,1607.9 237.87,1613.52 605.64,1615.43 1441.14,1616.4 1116.88,1616.51 1196.92,1623.13 518.75,1628.89 284.05,1630.96 1479.02,1635.34 584.65,1636.42 1137.87,1637.5 244.6,1642.44 1217.91,1644.12 1432.53,1644.81 52.57,1648.4 82.26,1648.4 111.94,1648.4 141.63,1648.4 171.31,1648.4 201,1648.4 1520.44,1648.4 1550.12,1648.4 1579.81,1648.4 1609.49,1648.4 1639.18,1648.4 1668.86,1648.4 497.76,1649.88 295.56,1658.32 563.66,1657.41 1158.86,1658.5 1469.16,1663.34 1238.9,1665.11 255.57,1670.02 476.77,1670.87 1418.15,1670.78 542.67,1678.4 1179.85,1679.49 312.28,1682.85 1259.89,1686.1 1455.04,1689.45 455.78,1691.86 1399.43,1693.82 270.54,1695.65 521.68,1699.39 1200.84,1700.48 1282.18,1705.71 431.98,1709.6 1437.17,1713.15 1309.64,1716.97 403.46,1717.84 289.18,1718.76 373.78,1718.53 1339.29,1718.53 1368.97,1718.53 344.11,1719.43 500.69,1720.38 1221.83,1721.47 479.14,1740.79 1243.47,1741.79 316.11,1744.49 1405.33,1744.49 454.28,1757.02 1268.59,1757.61 426.25,1766.78 1296.7,1767.15 346.49,1770.02 371.97,1770.39 396.8,1770.5 1326.27,1770.45 1355.95,1770.45 1433.45,1771.57 284.33,1775.74 1389.3,1785.03 1451.9,1794.83 266.45,1799.44 315.75,1802.17 1409.62,1806.66 1466.67,1820.58 252.32,1825.54 298.06,1826.01 1426.19,1831.3 52.57,1840.58 82.26,1840.58 111.94,1840.58 141.63,1840.58 171.31,1840.58 201,1840.58 1520.44,1840.58 1550.12,1840.58 1579.81,1840.58 1609.49,1840.58 1639.18,1840.58 1668.86,1840.58 1477.42,1848.25 285.74,1853.02 242.46,1853.54 1437.62,1858.69 1483.91,1877.21 278.46,1881.8 237.01,1882.72 1443.62,1887.76 1485.6,1906.85 235.84,1912.39 276.81,1911.44 1444.62,1917.43 1485.6,1936.54 276.81,1941.12 235.84,1942.07 1444.62,1947.12 1485.6,1966.22 276.81,1970.81 235.84,1971.76 1444.62,1976.8 273.9,2000.35 1449.88,2006.02 256.16,2024.15 230.68,2037.77 1490.75,2037.77 230.68,2067.46 1490.75,2067.46 230.68,2097.14 1490.75,2097.14 230.68,2126.83 1490.75,2126.83 230.68,2156.51 1490.75,2156.51 52.57,2186.2 82.26,2186.2 111.94,2186.2 141.63,2186.2 171.31,2186.2 201,2186.2 230.68,2186.2 1490.75,2186.2 1520.44,2186.2 1550.12,2186.2 1579.81,2186.2 1609.49,2186.2 1639.18,2186.2 1668.86,2186.2
  other v2: 260,155.91 860,155.91 320,275.91 1400,275.91 380,395.91 500,395.91 620,395.91 740,395.91 980,395.91 1100,395.91 1220,395.91 1340,395.91 440,515.91 560,515.91 680,515.91 1040,515.91 1160,515.91 1280,515.91 620,635.91 740,635.91 980,635.91 1100,635.91 680,755.91 1040,755.91 620,875.91 740,875.91 980,875.91 1100,875.91 320,995.91 680,995.91 1040,995.91 1400,995.91 380,1115.91 740,1115.91 1340,1115.91 320,1235.91 440,1235.91 560,1235.91 1160,1235.91 1280,1235.91 1400,1235.91 380,1355.91 500,1355.91 1220,1355.91 1340,1355.91 440,1475.91 560,1475.91 1160,1475.91 1280,1475.91 380,1595.91 740,1595.91 980,1595.91 1340,1595.91 680,1715.91 800,1715.91 1040,1715.91 500,1835.91 620,1835.91 740,1835.91 980,1835.91 1100,1835.91 1220,1835.91 440,1955.91 560,1955.91 680,1955.91 1040,1955.91 1160,1955.91 1280,1955.91 380,2075.91 500,2075.91 620,2075.91 1220,2075.91 1340,2075.91 320,2195.91 440,2195.91 560,2195.91 1160,2195.91 1280,2195.91 1400,2195.91 140,2315.91 260,2315.91 620,2315.91
IN_N: IC1.4 TA6.D | length 806.4
  Top Layer w4: TA6.D@866.83,359.65 866.83,1114.47 ; 866.83,1113.94 cw(c893.87,1113.6) 874.22,1132.18 874.85,1132.85 886.34,1145.61 IC1.4
IN_P: IC1.1 TA4.D | length 819.7
  Top Layer w4: TA4.D@854.6,359.65 854.6,1114.47 ; 854.6,1113.94 ccw(c827.56,1113.6) 847.21,1132.18 846.58,1132.85 IC1.1@835.1,1145.61 ; IC1.1@835.1,1145.61 IC1.1 IC1.1@835.12,1145.61
NetC1_2: C1.2 IC1.2 IC1.3 | length 21.4
  Top Layer w5: v1(860.72,1140.8) 861.85,1140.8 867.15,1146.11 IC1.3
NetIC1_5: IC1.5 W1.2 | length 857.5
  Top Layer w5: IC1.5 921.47,1187.9 cw(c921.47,1171.47) v1(937.89,1171.47)
  Bottom Layer w5: W1.2 876.21,1927.92 876.21,1373.57 886.97,1362.81 886.97,1266.63 937.89,1215.71 v1(937.89,1171.47)
NetJ0_1: J0.1 TA1.S | length 475.5
  Top Layer w5.18: J0.1@39.8,400 226.91,400 ccw(c226.91,429.4) 256.31,429.4 256.32,509.7 cw(c429.72,509.7) 307.11,632.31 TA1.S@325.31,650.51
NetJ1_1: J1.1 TA2.S | length 475.5
  Top Layer w5.18: J1.1@39.8,937.8 226.91,937.8 cw(c226.91,908.4) 256.31,908.4 256.32,828.1 ccw(c429.72,828.1) 307.11,705.49 TA2.S@325.31,687.29
NetJ2_1: J2.1 TA3.S | length 475.5
  Top Layer w5.18: J2.1@39.8,1475.59 226.91,1475.59 ccw(c226.91,1504.99) 256.31,1504.99 256.32,1585.29 cw(c429.72,1585.29) 307.11,1707.9 TA3.S@325.31,1726.1
NetJ3_1: J3.1 TA5.S | length 475.5
  Top Layer w5.18: J3.1@39.8,2013.39 226.91,2013.39 cw(c226.91,1983.99) 256.31,1983.99 ; 256.32,1983.98 256.32,1903.69 ccw(c429.72,1903.69) 307.11,1781.08 TA5.S@325.31,1762.88
NetJ4_1: J4.1 TA7.S | length 475.5
  Top Layer w5.18: TA7.S@1396.12,1762.88 1414.32,1781.08 ccw(c1291.71,1903.69) 1465.11,1903.69 1465.11,1983.98 ; 1465.12,1983.99 cw(c1494.52,1983.99) 1494.52,2013.39 J4.1@1681.63,2013.39
NetJ5_1: J5.1 TA8.S | length 475.5
  Top Layer w5.18: TA8.S@1396.12,1726.1 1414.32,1707.9 cw(c1291.71,1585.29) 1465.11,1585.29 1465.11,1505 ccw(c1494.52,1504.99) 1494.52,1475.59 J5.1@1681.63,1475.59
NetJ6_1: J6.1 TA9.S | length 475.5
  Top Layer w5.18: TA9.S@1396.12,687.29 1414.32,705.49 ccw(c1291.71,828.1) 1465.11,828.1 1465.11,908.38 cw(c1494.52,908.4) 1494.52,937.8 J6.1@1681.63,937.8
NetJ7_1: J7.1 TA10.S | length 475.5
  Top Layer w5.18: TA10.S@1396.12,650.51 1414.32,632.31 cw(c1291.71,509.7) 1465.11,509.7 1465.11,429.41 ccw(c1494.52,429.4) 1494.52,400 J7.1@1681.63,400
NetJ8_1: J8.1 TA4.S | length 475.5
  Top Layer w5.18: J8.1@591.82,39.8 591.82,226.91 cw(c621.22,226.91) 621.22,256.31 ; 621.23,256.32 701.52,256.32 ccw(c701.52,429.73) 824.13,307.11 TA4.S@842.33,325.31
NetJ9_1: J9.1 TA6.S | length 475.5
  Top Layer w5.18: TA6.S@879.11,325.31 897.31,307.11 ccw(c1019.92,429.73) 1019.92,256.32 1100.2,256.32 cw(c1100.22,226.91) 1129.62,226.91 J9.1@1129.62,39.8
OUT_0_N: IC1.14 TA2.D | length 822.4
  Top Layer w4: TA2.D 398.57,675.01 ccw(c398.57,743.67) 467.23,743.67 467.23,943.89 cw(c579.11,943.89) 500,1023 675.73,1198.74 cw(c735.62,1138.84) 735.62,1223.54 792.66,1223.54 ccw(c792.66,1236.27) IC1.14
OUT_0_P: IC1.15 TA1.D | length 822.4
  Top Layer w4: TA1.D 398.57,662.78 ccw(c398.57,743.67) 479.45,743.67 479.45,943.75 cw(c579.45,943.75) 508.74,1014.46 684.3,1190.01 cw(c735.72,1138.6) 735.72,1211.31 792.66,1211.31 cw(c792.66,1198.58) IC1.15
OUT_1_N: IC1.11 TA5.D | length 821.7
  Top Layer w4: TA5.D 396.11,1750.6 cw(c396.11,1638.84) 475.14,1717.87 641.78,1551.23 645.72,1547.28 680.14,1512.86 cw(c652.4,1485.13) 680.14,1457.39 672.43,1449.68 ccw(c691.52,1430.59) 710.61,1411.49 718.32,1419.21 cw(c746.06,1391.47) 773.8,1419.21 775.59,1417.42 779.53,1413.47 833.98,1359.03 cw(c802.18,1327.23) 847.15,1327.23 847.15,1285.48 ccw(c859.88,1285.48) IC1.11
OUT_1_P: IC1.12 TA3.D | length 821.2
  Top Layer w4: TA3.D 395.91,1738.38 cw(c395.91,1638.38) 466.63,1709.09 633.13,1542.58 637.08,1538.64 671.49,1504.22 cw(c652.4,1485.13) 671.49,1466.03 663.78,1458.32 ccw(c691.52,1430.59) 663.75,1402.88 663.8,1402.83 ccw(c691.52,1430.59) 719.26,1402.85 726.97,1410.56 cw(c746.06,1391.47) 765.15,1410.56 766.94,1408.77 770.89,1404.82 785.97,1389.74 797.28,1378.43 cw(c792.33,1373.48) 797.28,1368.53 796.31,1367.56 ccw(c801.26,1362.61) 796.31,1357.66 ccw(c801.26,1362.61) 806.21,1357.66 807.18,1358.63 cw(c812.13,1353.68) 817.08,1358.63 825.28,1350.43 cw(c802.02,1327.17) 834.92,1327.17 834.92,1285.48 cw(c822.19,1285.48) IC1.12
OUT_2_N: IC1.9 TA8.D | length 821.2
  Top Layer w4: IC1.9 cw(c899.25,1285.48) 886.52,1285.48 886.52,1327.17 cw(c919.41,1327.17) 896.15,1350.43 904.35,1358.63 cw(c909.3,1353.68) 914.25,1358.63 915.23,1357.66 ccw(c920.18,1362.61) 925.13,1357.66 ccw(c920.18,1362.61) 925.13,1367.56 924.15,1368.53 cw(c929.1,1373.48) 924.15,1378.43 935.47,1389.74 950.55,1404.82 954.49,1408.77 956.28,1410.56 cw(c975.38,1391.47) 994.47,1410.56 1002.18,1402.85 ccw(c1029.92,1430.59) 1057.63,1402.83 1057.68,1402.88 ccw(c1029.92,1430.59) 1057.65,1458.32 1049.94,1466.03 cw(c1069.03,1485.13) 1049.94,1504.22 1084.36,1538.64 1088.3,1542.58 1254.81,1709.09 cw(c1325.52,1638.38) 1325.52,1738.38 TA8.D
OUT_2_P: IC1.10 TA7.D | length 821.7
  Top Layer w4: IC1.10 ccw(c861.56,1285.48) 874.29,1285.48 874.29,1327.23 cw(c919.25,1327.23) 887.46,1359.03 941.9,1413.47 945.85,1417.42 947.64,1419.21 cw(c975.38,1391.47) 1003.11,1419.21 1010.82,1411.49 ccw(c1029.92,1430.59) 1049.01,1449.68 1041.3,1457.39 cw(c1069.03,1485.13) 1041.3,1512.86 1075.71,1547.28 1079.66,1551.23 1246.3,1717.87 cw(c1325.33,1638.84) 1325.33,1750.6 TA7.D
OUT_3_N: IC1.6 TA10.D | length 822.4
  Top Layer w4: IC1.6 cw(c928.78,1198.58) 928.78,1211.31 985.72,1211.31 cw(c985.72,1138.6) 1037.13,1190.01 1212.69,1014.46 cw(c1141.98,943.75) 1241.98,943.75 1241.98,743.67 ccw(c1322.87,743.67) 1322.87,662.78 TA10.D
OUT_3_P: IC1.7 TA9.D | length 822.4
  Top Layer w4: IC1.7 ccw(c928.78,1236.27) 928.78,1223.54 985.82,1223.54 cw(c985.82,1138.84) 1045.7,1198.74 1221.44,1023 cw(c1142.33,943.89) 1254.21,943.89 1254.21,743.67 ccw(c1322.87,743.67) 1322.87,675.01 TA9.D
Vcc: C2.2 C3.2 C4.2 C5.2 C6.2 C7.2 C8.2 IC1.8 IC1.13 P1.1 W1.1
  other v1: 745.93,1271.21 975.5,1271.21 764.25,1282.63 957.18,1282.63 745.74,1292.54 975.69,1292.54 764.34,1303.54 957.1,1303.54 745.24,1314.05 976.2,1314.05 978.36,2066.06 1013.68,2066.06 978.36,2100.52 1013.68,2100.52 978.36,2134.98 1012.82,2134.98 978.36,2169.44 1012.82,2169.44 1017.7,2194.13 898.82,2194.71 898.82,2229.17 1017.7,2228.59 1017.7,2263.05 898.82,2263.63
pads on no net: FTG1.FTG2 FTG2.FTG2

## Polygon pours and split planes (outlines as drawn)
GND on Bottom Layer "GND_L04_P025" (solid, remove dead copper, pour order 25): 0,2434.85 1721.43,2434.85 1721.43,0 0,0
Vcc on Bottom Layer "VCC_L04_P017" (solid, remove dead copper, pour order 17): 934.77,1311.69 946.58,1327.23 986.51,1327.23 986.51,1254.12 934.77,1254.12
Vcc on Bottom Layer "VCC_L04_P020" (solid, remove dead copper, pour order 20): 1044.46,2291.33 1044.46,2046.53 873.58,2046.53 873.58,2291.33
Vcc on Bottom Layer "VCC_L04_P006" (solid, remove dead copper, pour order 6): 786.67,1311.69 774.86,1327.23 734.92,1327.23 734.92,1254.12 786.67,1254.12
Vcc on Top Layer "Top Layer-Vcc 1" (solid, remove dead copper, pour order 18): 950.55,1255.36 1040.97,1255.36 1040.97,1327.17 950.55,1327.17 905.01,1252.86 905.01,1241.05 934.54,1241.05
GND on Top Layer "GND_L01_P024" (solid, remove dead copper, pour order 24): 0,2434.85 1721.43,2434.85 1721.43,0 0,0
Vcc on Top Layer "VCC_L01_P021" (solid, remove dead copper, pour order 21): 1044.46,2291.33 1044.46,2046.53 873.58,2046.53 873.58,2291.33
Vcc on Top Layer "Top Layer-Vcc 1" (solid, remove dead copper, pour order 11): 770.89,1255.36 680.46,1255.36 680.46,1327.17 770.89,1327.17 816.43,1252.86 816.43,1241.05 786.9,1241.05
GND on POWER (split plane): 1696.36,25.08 25.08,25.08 25.08,1252.8 1696.36,1252.8
Vcc on POWER (split plane): 1696.36,1263 25.08,1263 25.08,2409.77 1696.36,2409.77
GND on GND (split plane): 1721.38,0.05 0.05,0.05 0.05,2434.79 1721.38,2434.79

## Keep-outs
Keep-Out Layer:
  the board outline again, w7.87

## Other copper
Top Layer:
  pour cut-out: 850.79,1310.9 850.79,1319.49 850.75,1319.53 870.82,1319.53 870.82,1310.9
  pour cut-out: 1721.43,1988.39 1721.43,2038.39 1681.04,2021.98 1681.04,2004.8
  pour cut-out: 1721.43,1450.59 1721.43,1500.59 1681.04,1484.18 1681.04,1467
  pour cut-out: 1721.43,912.8 1721.43,962.8 1681.04,946.39 1681.04,929.2
  pour cut-out: 1721.43,375 1721.43,425 1681.04,408.59 1681.04,391.41
  pour cut-out: 1104.62,0 1154.62,0 1138.21,40.4 1121.02,40.4
  pour cut-out: 566.82,0 616.82,0 600.41,40.4 583.23,40.4
  pour cut-out: 0,425 0,375 40.4,391.41 40.4,408.59
  pour cut-out: 0,962.8 0,912.8 40.4,929.2 40.4,946.39
  pour cut-out: 0,1500.59 0,1450.59 40.4,1467 40.4,1484.18
  pour cut-out: 0,2038.39 0,1988.39 40.4,2004.8 40.4,2021.98
  pour cut-out: 1383.44,651.04 1386.27,653.87 1399.87,640.27 1397.04,637.44
  pour cut-out: 1359.82,654.78 1359.82,658.78 1374.42,658.78 1374.42,654.78
  pour cut-out: 1359.82,683.02 1359.82,679.02 1374.42,679.02 1374.42,683.02
  pour cut-out: 1383.44,686.75 1386.27,683.92 1399.87,697.53 1397.04,700.36
  pour cut-out: 1402.57,656.21 1399.74,653.38 1386.14,666.99 1388.97,669.82
  pour cut-out: 1402.57,681.59 1399.74,684.41 1386.14,670.81 1388.97,667.98
  region net GND: 1393.41,672.43 1393.41,665.37 1391.7,667.08 1391.7,670.71
  pour cut-out: 1383.44,1726.63 1386.27,1729.46 1399.87,1715.86 1397.04,1713.03
  pour cut-out: 1359.82,1730.37 1359.82,1734.37 1374.42,1734.37 1374.42,1730.37
  pour cut-out: 1359.82,1758.61 1359.82,1754.61 1374.42,1754.61 1374.42,1758.61
  pour cut-out: 1383.44,1762.34 1386.27,1759.52 1399.87,1773.12 1397.04,1775.95
  pour cut-out: 1402.57,1731.8 1399.74,1728.97 1386.14,1742.58 1388.97,1745.41
  pour cut-out: 1402.57,1757.18 1399.74,1760 1386.14,1746.4 1388.97,1743.57
  region net GND: 1393.41,1748.02 1393.41,1740.96 1391.7,1742.67 1391.7,1746.3
  pour cut-out: 338,1762.34 335.17,1759.52 321.56,1773.12 324.39,1775.95
  pour cut-out: 361.62,1758.61 361.62,1754.61 347.01,1754.61 347.01,1758.61
  pour cut-out: 361.62,1730.37 361.62,1734.37 347.01,1734.37 347.01,1730.37
  pour cut-out: 338,1726.63 335.17,1729.46 321.56,1715.86 324.39,1713.03
  pour cut-out: 318.86,1757.18 321.69,1760 335.3,1746.4 332.47,1743.57
  pour cut-out: 318.86,1731.8 321.69,1728.97 335.3,1742.58 332.47,1745.41
  region net GND: 328.02,1740.96 328.02,1748.02 329.74,1746.3 329.74,1742.67
  pour cut-out: 338,686.75 335.17,683.92 321.56,697.53 324.39,700.36
  pour cut-out: 361.62,683.02 361.62,679.02 347.01,679.02 347.01,683.02
  pour cut-out: 361.62,654.78 361.62,658.78 347.01,658.78 347.01,654.78
  pour cut-out: 338,651.04 335.17,653.87 321.56,640.27 324.39,637.44
  pour cut-out: 318.86,681.59 321.69,684.41 335.3,670.81 332.47,667.98
  pour cut-out: 318.86,656.21 321.69,653.38 335.3,666.99 332.47,669.82
  region net GND: 328.02,665.37 328.02,672.43 329.74,670.71 329.74,667.08
  region net GND: 864.25,328.02 857.19,328.02 858.9,329.74 862.53,329.74
  pour cut-out: 873.4,318.86 876.23,321.69 862.63,335.3 859.8,332.47
  pour cut-out: 848.03,318.86 845.2,321.69 858.81,335.3 861.63,332.47
  pour cut-out: 878.57,338 875.74,335.17 889.35,321.56 892.18,324.39
  pour cut-out: 874.84,361.62 870.84,361.62 870.84,347.01 874.84,347.01
  pour cut-out: 846.59,361.62 850.59,361.62 850.59,347.01 846.59,347.01
  pour cut-out: 842.86,338 845.69,335.17 832.09,321.56 829.26,324.39
  pour cut-out: 901.05,1174.01 904.09,1177.05 900.31,1180.84 897.27,1177.8
  pour cut-out: 820.42,1260.67 824.01,1257.51 820.95,1254.45 817.73,1257.2
  pour cut-out: 901.14,1260.67 897.55,1257.51 900.61,1254.45 903.83,1257.2
Bottom Layer:
  rectangle net NetC1_2: 850.87,1124.99 887.99,1156.63
POWER (plane layer: these items are gaps in the copper):
  lines w10: 13.38,1257.9 1734.81,1257.9
  lines w50: 0,0 1721.43,0 1721.43,2434.85 0,2434.85 0,0

## Silkscreen, mask and mechanical layers (free items; w line width, h text height)
Top Overlay:
  text "Power IN" at 312.83,2339.05 h40 r359.89
  text "1.8V/2.5V/3.3V" at 223.28,2281.7 h30 r359.89
  text "GND" at 518.79,2179.44 h40
  text "Vcc" at 1105.85,2179.44 h40
  text "P" at 1445.2,2152.4 h40
  text "N" at 254.38,2150.35 h40
  text "Eq En" at 1005.56,1940.23 h40
  text "4 matched length outputs" at 395.38,1814.2 h40
  text "P" at 254.38,1362.22 h40
  text "N" at 1445.2,1362.22 h40
  text "N" at 254.38,1074.32 h40
  text "P" at 1445.2,1072.28 h40
  text "P" at 254.38,286.19 h40
  text "N" at 1445.2,280.06 h40
  text "N" at 1218.56,253.52 h40
  text "P" at 479.43,249.44 h40
  text "IN" at 831.45,185.59 h40
Bottom Overlay:
  text "Dec 2024" at 1674.42,44.78 h38
  text "Rev 1.0" at 411.9,32.84 h38
Top Solder:
  drawing of 11 lines, arcs and shapes, not listed
Bottom Solder:
  drawing of 9 lines, arcs and shapes, not listed
  text "CERN" at 512.56,2306.36 h54.42
  text "EP-ESE" at 1672.98,2256.14 h180
Edge Plating Skip:
  rectangle: -25,375 25,425
  rectangle: -25,912.8 25,962.8
  rectangle: -25,1450.59 25,1500.59
  rectangle: -25,1988.39 25,2038.39
  rectangle: 1696.43,1988.39 1746.43,2038.39
  rectangle: 1696.43,1450.59 1746.43,1500.59
  rectangle: 1696.43,912.8 1746.43,962.8
  rectangle: 1696.43,375 1746.43,425
  rectangle: 1104.61,-25 1154.61,25
  rectangle: 566.82,-25 616.82,25

## Text inside footprints (layer, text, board x,y; h text height)
J0: Mechanical 13 "PCB EDGE" at 8.01,230.55 h24 r270
J1: Mechanical 13 "PCB EDGE" at 8.01,768.35 h24 r270
J2: Mechanical 13 "PCB EDGE" at 8.01,1306.14 h24 r270
J3: Mechanical 13 "PCB EDGE" at 8.01,1843.94 h24 r270
J4: Mechanical 13 "PCB EDGE" at 1713.43,2182.84 h24 r90
J5: Mechanical 13 "PCB EDGE" at 1713.43,1645.04 h24 r90
J6: Mechanical 13 "PCB EDGE" at 1713.43,1107.25 h24 r90
J7: Mechanical 13 "PCB EDGE" at 1713.43,569.45 h24 r90
J8: Mechanical 13 "PCB EDGE" at 761.27,8.01 h24
J9: Mechanical 13 "PCB EDGE" at 1299.07,8.01 h24